# Altium PCB PI_V1.PcbDoc
Units mil, origin at the board's own origin, x right, y up, seen from the top; angles counter-clockwise.
Board outline 3075 x 3000 mil, 2 copper layers (Top Layer, Bottom Layer); 21 components, 18 nets, 101 pads, 134 vias.
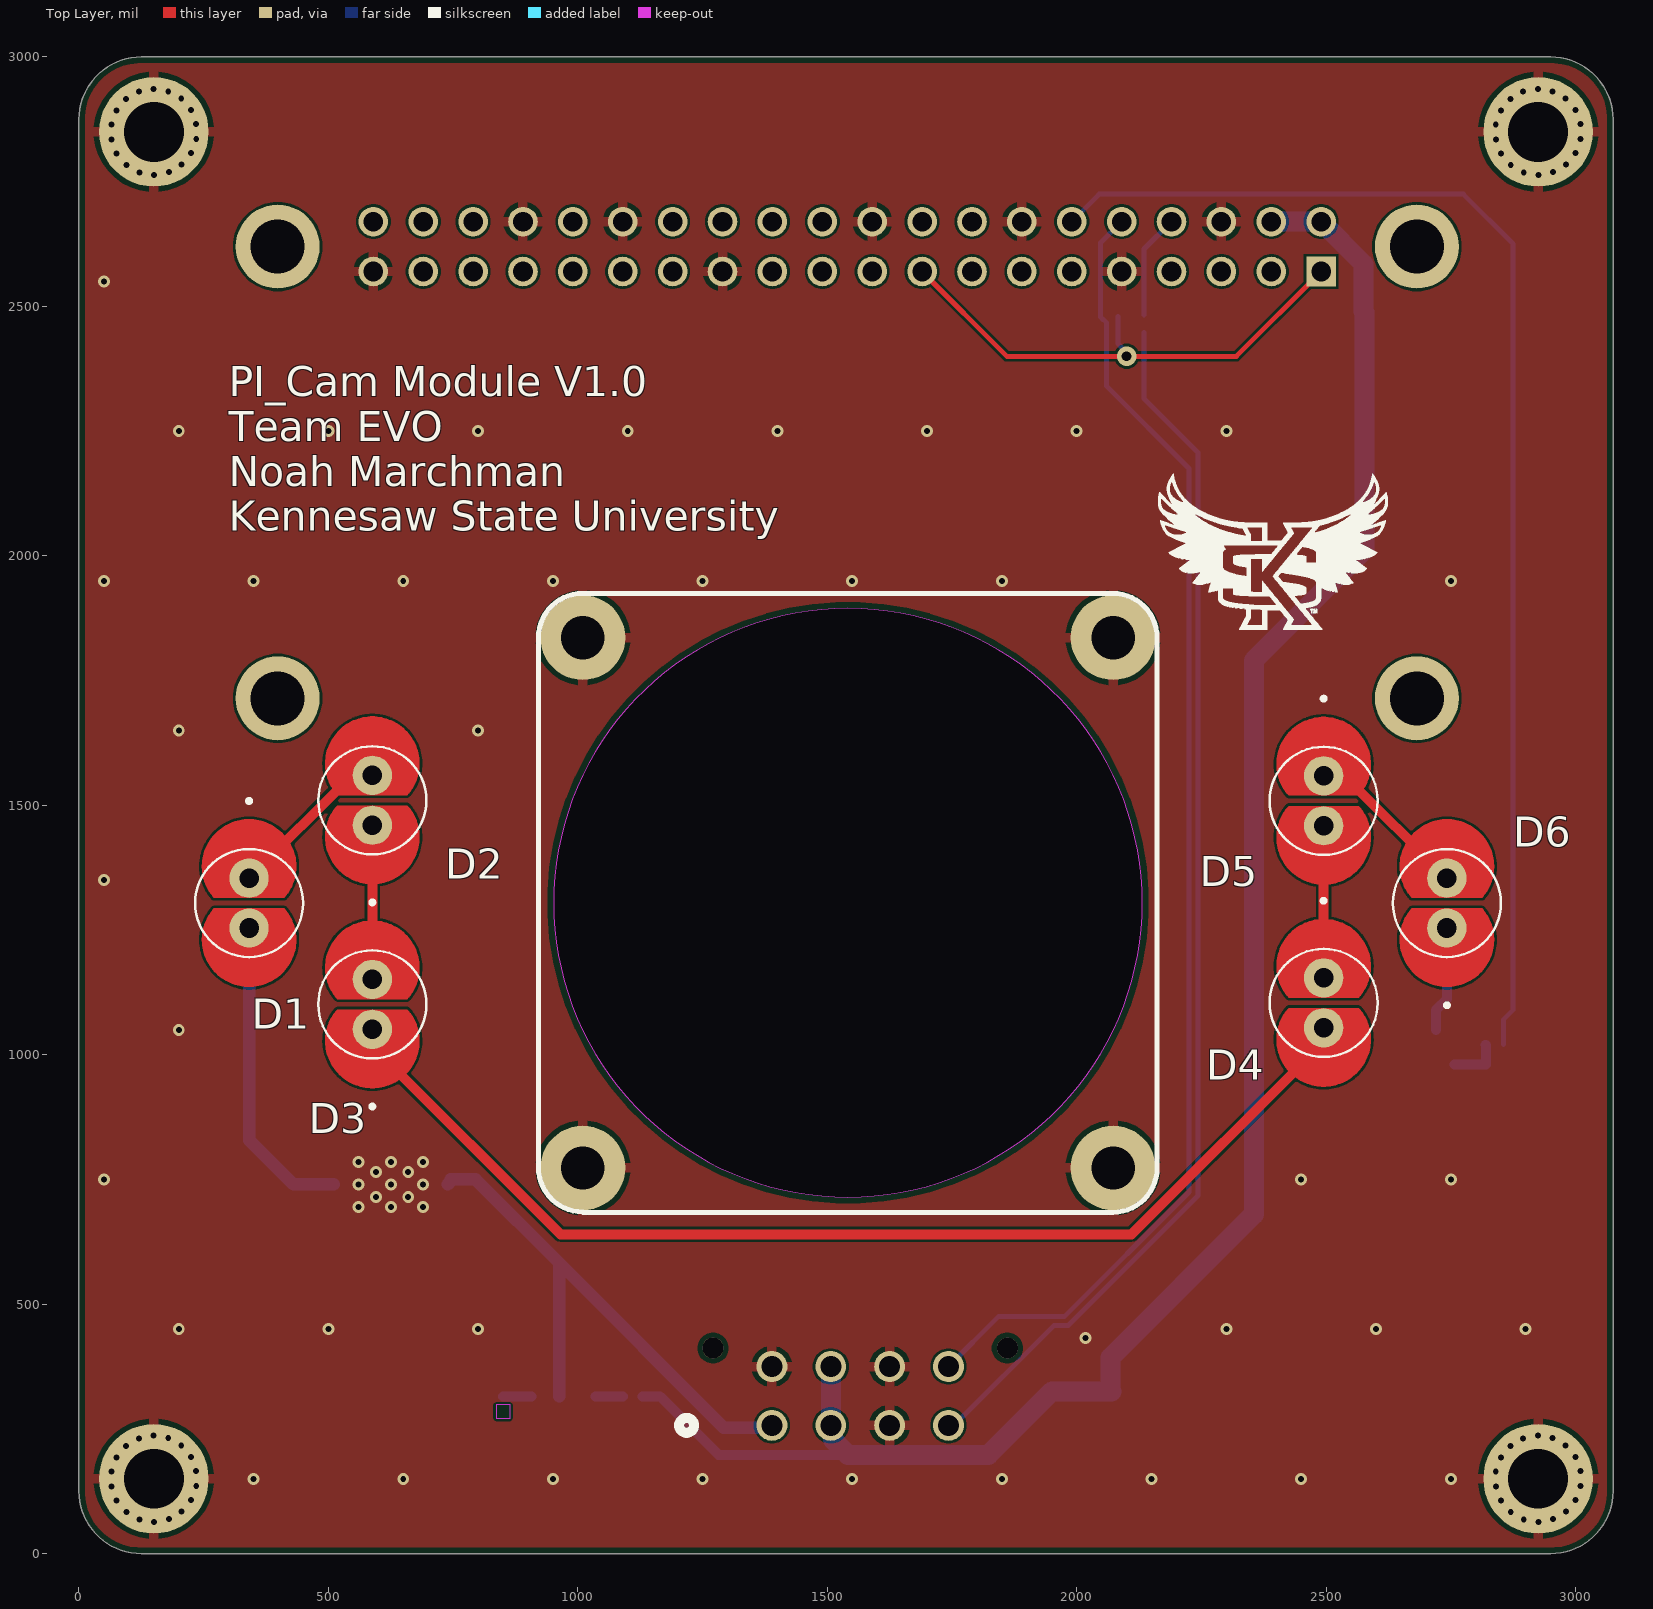
[diagram p0: Top Layer view]
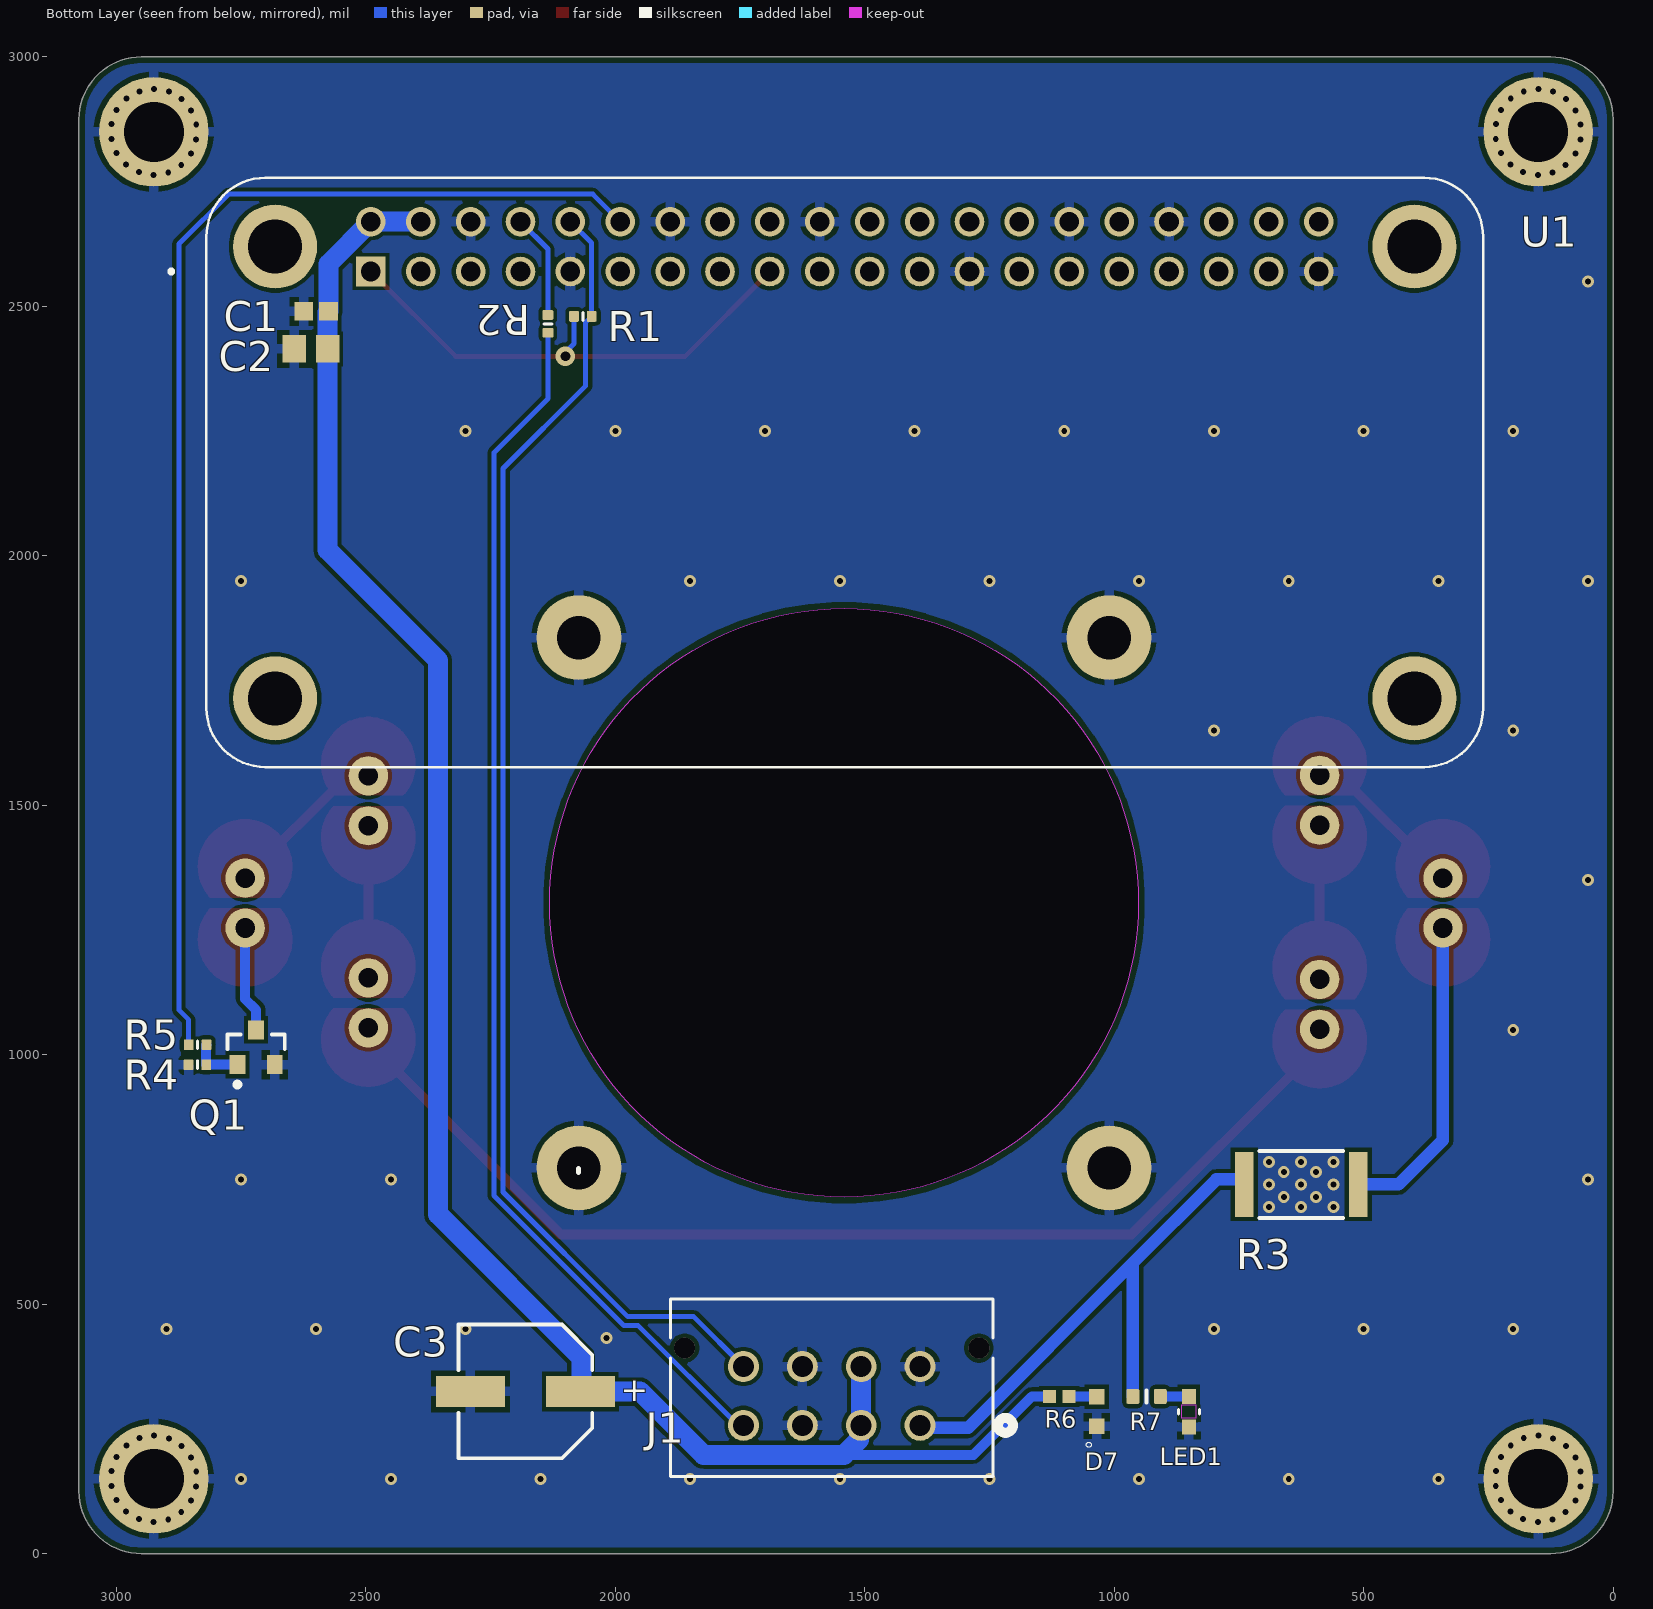
[diagram p1: Bottom Layer view, seen from below]
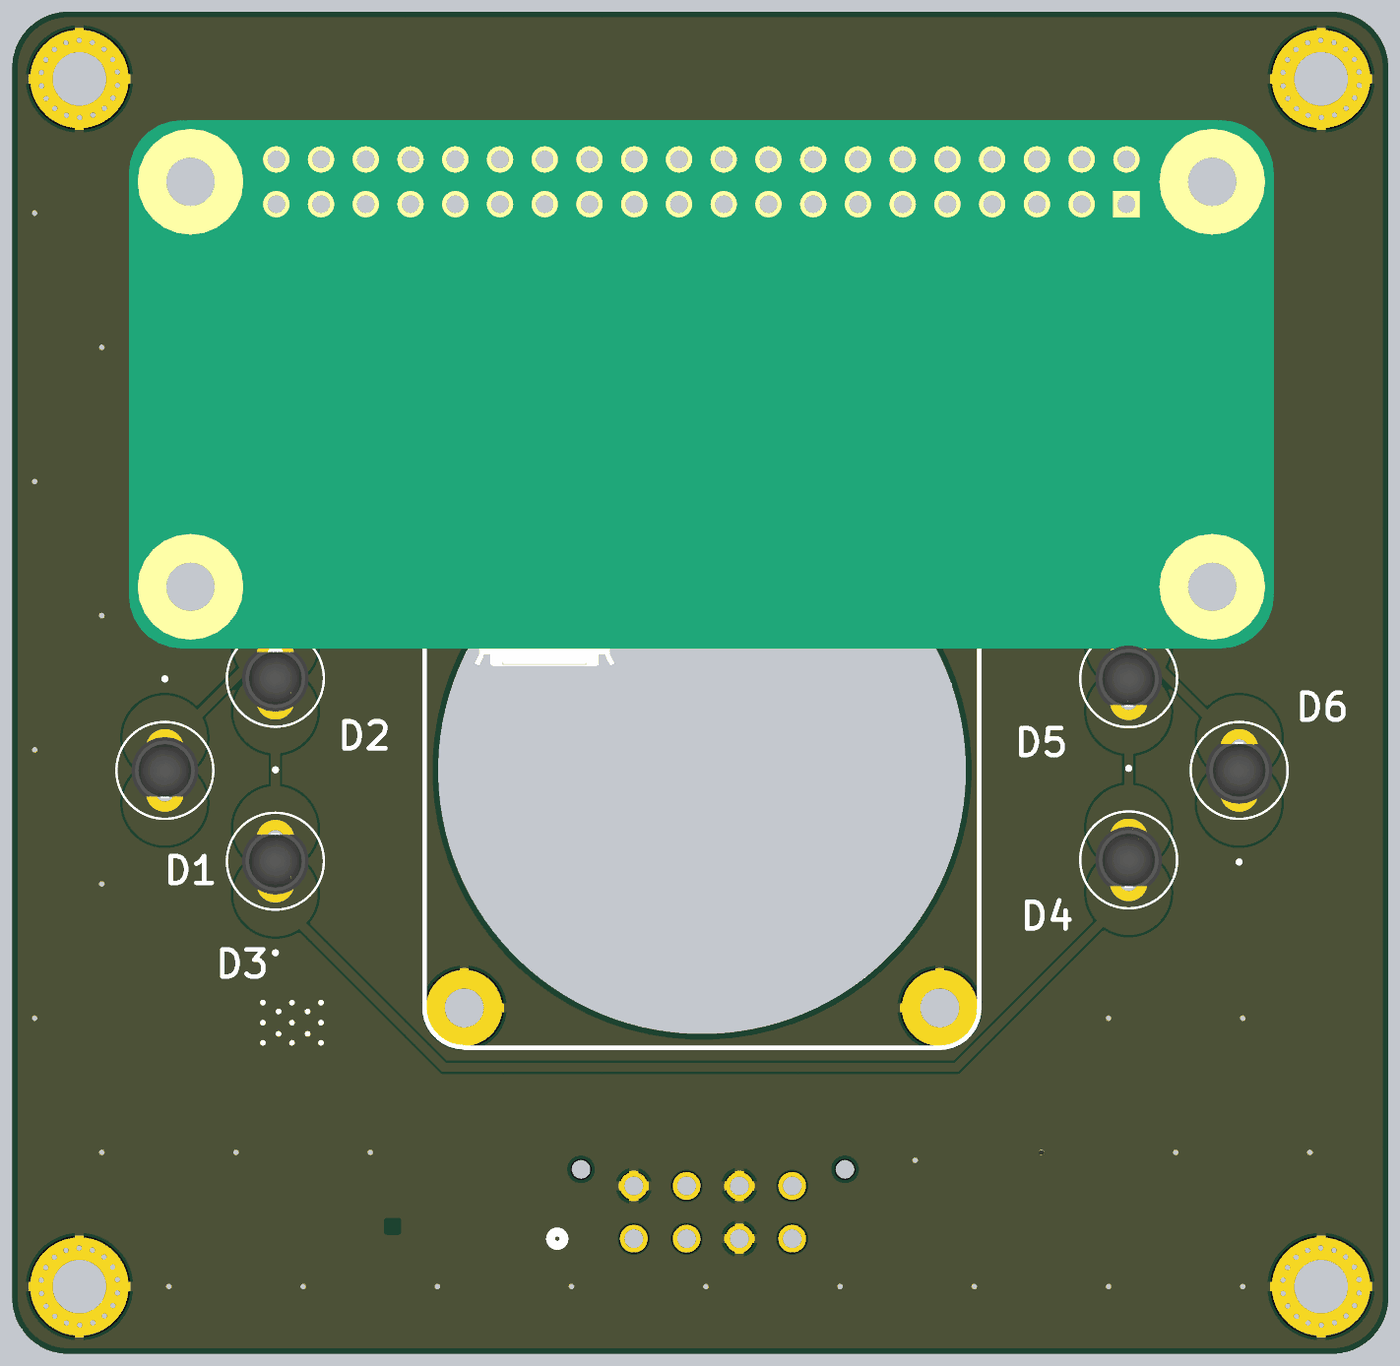
[diagram p2: 3D render of the assembled board from above, using the file's embedded part models]
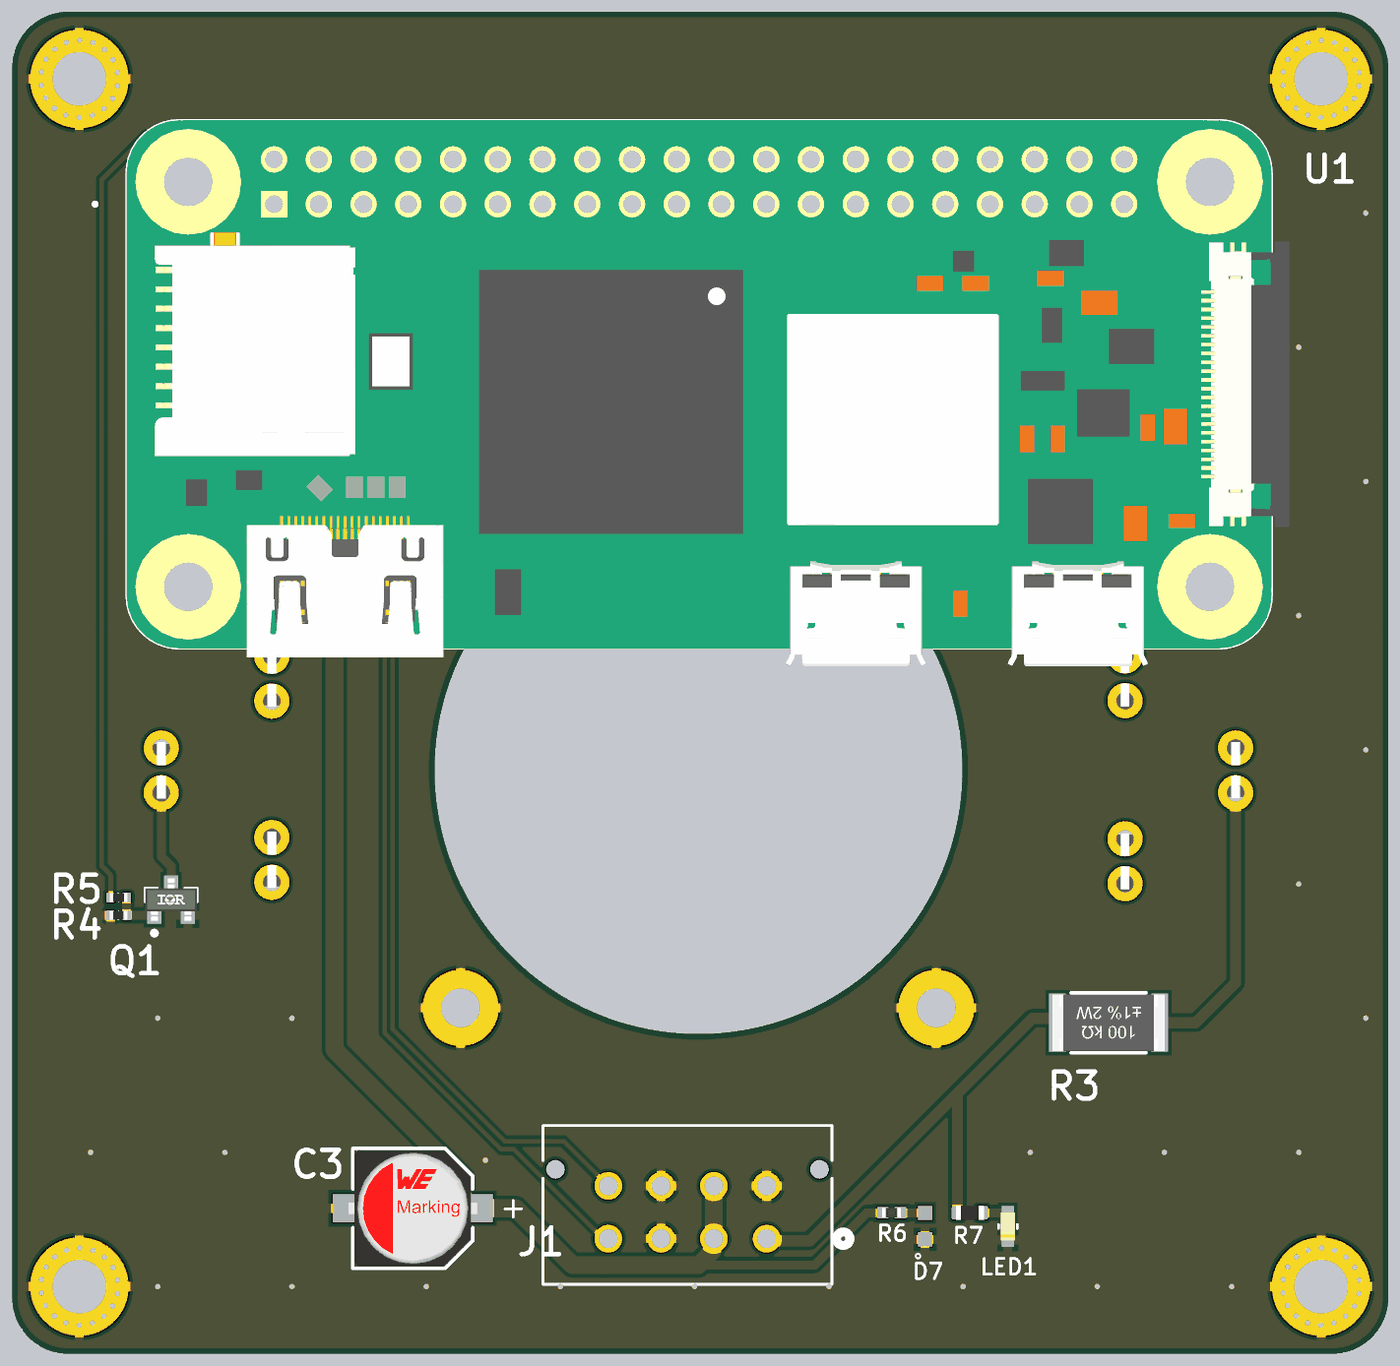
[diagram p3: 3D render of the assembled board from below, using the file's embedded part models]

## Layer stack, top to bottom
Top Solder: solder mask 0.4, Solder Resist, Dk 3.5
Top Layer: signal copper 1.4
Dielectric 1: dielectric 12.6, FR-4, Dk 4.8
Bottom Layer: signal copper 1.4
Bottom Solder: solder mask 0.4, Solder Resist, Dk 3.5

## Board outline
0,125 0,2875 cw(c125,2875) 125,3000 2950,3000 cw(c2950,2875) 3075,2875 3075,125 cw(c2950,125) 2950,0 125,0 cw(c125,125)
cut-out: 951.5,1304.5 ccw(c1541.5,1304.5) 1541.5,714.5 ccw(c1541.5,1304.5) 2131.5,1304.5 ccw(c1541.5,1304.5) 1541.5,1894.5 ccw(c1541.5,1304.5)

## Design rules (kind name [scope] priority, off if disabled: settings)
BoardOutlineClearance [All] p1: gap=12 ignorepadtopadclearanceinfootprint=FALSE
Clearance "Clearance Bottom Layer" [OnLayer('Bottom Layer')] p1: gap=8 ignorepadtopadclearanceinfootprint=TRUE except(10: Arc-Text Track-Text SMDPad-Text THPad-Text Via-Text Fill-Text Poly-Text Region-Text Text-Text)
Clearance [All] p2: gap=5 ignorepadtopadclearanceinfootprint=FALSE except(9.84: Arc-Hole Track-Hole SMDPad-Hole THPad-Hole Via-Hole Fill-Hole Poly-Hole Region-Hole Text-Hole)
Clearance "Clearance Top Layer" [OnLayer('Top Layer')] p3: gap=8 ignorepadtopadclearanceinfootprint=TRUE except(10: Arc-Text Track-Text SMDPad-Text THPad-Text Via-Text Fill-Text Poly-Text Region-Text Text-Text)
ComponentClearance [All] p1: gap=5 collisioncheckmode=3 verticalgap=5 showdistances=TRUE
DiffPairsRouting [All] p1: maxlimit=10 minlimit=5 mostfreqgap=5 toplayer_minwidth=5 toplayer_maxwidth=1000 toplayer_prefwidth=5 bottomlayer_minwidth=5 bottomlayer_maxwidth=1000 bottomlayer_prefwidth=5 maxuncoupledlength=500
Height [All] p1: minheight=0 maxheight=71497.94 prefheight=500
HoleSize [All] p1: absolutevalues=TRUE maxlimit=248.03 minlimit=11.81 maxpercent=80.000 minpercent=20.000
HoleToHoleClearance [All] p1: gap=9.84 allowstackedmicrovias=FALSE
MinimumAnnularRing [All] p1: minimumring=3
MinimumSolderMaskSliver [All] p1: minsoldermaskwidth=0
PlaneClearance [All] p1: clearance=8
PlaneConnect PlaneConnectPowerPads [InPadClass('PowerPads')] p1: planeconnectstyle=Direct reliefexpansion=20 reliefentries=4 reliefconductorwidth=10 reliefairgap=10
PlaneConnect [All] p2: pad.planeconnectstyle=Relief pad.reliefexpansion=11.81 pad.reliefentries=4 pad.reliefconductorwidth=5 pad.reliefairgap=5 via.planeconnectstyle=Direct via.reliefexpansion=11.81 via.reliefentries=4 via.reliefconductorwidth=5 via.reliefairgap=5
PolygonConnect PolygonConnect_1 [All] p1: thpad.connectstyle=Relief thpad.reliefconductorwidth=20 thpad.reliefentries=4 thpad.polygonreliefangle="90 Angle" thpad.airgapwidth=10 smdpad.connectstyle=Relief smdpad.reliefconductorwidth=20 smdpad.reliefentries=4 smdpad.polygonreliefangle="90 Angle" smdpad.airgapwidth=10 via.connectstyle=Direct via.reliefconductorwidth=20 via.reliefentries=4 via.polygonreliefangle="90 Angle" via.airgapwidth=10
PolygonConnect PolygonConnectPowerPads [All vs (InPadClass('PowerPads'))] p2: connectstyle=Direct reliefconductorwidth=10 reliefentries=4 polygonreliefangle="90 Angle" airgapwidth=10
PolygonConnect [All] p3: thpad.connectstyle=Relief thpad.reliefconductorwidth=5 thpad.reliefentries=4 thpad.polygonreliefangle="90 Angle" thpad.airgapwidth=5 smdpad.connectstyle=Relief smdpad.reliefconductorwidth=5 smdpad.reliefentries=4 smdpad.polygonreliefangle="90 Angle" smdpad.airgapwidth=5 via.connectstyle=Direct via.reliefconductorwidth=5 via.reliefentries=4 via.polygonreliefangle="90 Angle" via.airgapwidth=5
RoutingVias [All] p1: holewidth=11.81 width=23.62 viastyle="Through Hole" minholewidth=11.81 minwidth=23.62 maxholewidth=23.62 maxwidth=259.84
SilkToSilkClearance [All] p1: silktosilkclearance=0
SilkToSolderMaskClearance [IsPad] p1: minsilkscreentomaskgap=5 clearancetoexposedcopper=TRUE
SolderMaskExpansion [All] p1: expansion=2.95 istentingtop=FALSE
SupplyNets "Schematic Supply Nets_3" [InNet('+3V3')] p1: voltage=0.000
SupplyNets "Schematic Supply Nets_2" [InNet('+5')] p2: voltage=0.000
SupplyNets "Schematic Supply Nets_1" [InNet('GND')] p3: voltage=0.000
SupplyNets "Schematic Supply Nets" [InNet('+24')] p4: voltage=0.000
Width [All] p1: maxlimit=1000 minlimit=5 preferedwidth=5 minimp=50.000000 maximp=50.000000 favimp=50.000000
20 further rules are at their usual default settings.

## Components (designator, comment, footprint, x,y, rotation, side; value= is the part's Value field where it differs from the comment)
C1 "Capacitor 100 nF +/-10% 50 V 0603" CAPC1608X90X40NL10T20 2599.61,2490 r0 bottom value=100nF
C2 "Capacitor 10 uF +/- 10% 16 V 0805" CAPC2013X135X45NL10T25 2610,2415 r0 bottom value=10µF
C3 "100µF/50V" WCAP-ASLI_D6.3H7.7 2180,325 r180 bottom
D1 "SFH_4554" DIO_SFH_4554 341,1304 r270 top
D2 "SFH_4554" DIO_SFH_4554 588,1510 r90 top
D3 "SFH_4554" DIO_SFH_4554 588,1101 r90 top
D4 "SFH_4554" DIO_SFH_4554 2495,1104 r270 top
D5 "SFH_4554" DIO_SFH_4554 2495,1509 r270 top
D6 "SFH_4554" DIO_SFH_4554 2742,1304 r90 top
D7 "LTST-C190GKT" LEDM1608X80 1035,285 r90 bottom
J1 "430450813" CONN_SD-43045-005_08_MOL 1389,257 r180 bottom
LED1 "LTST-C191KRKT" LED_LTST-C191KRKT_LTO 850,284.5 r90 bottom
Q1 "IRLML0060" SOT95P237X112-3N-2-V 2720,1015 r90 bottom
R1 "10KR2F" RESC0402(1005)_L 2065,2480 r0 bottom value=10k
R2 "100R2F" RESC0402(1005)_L 2135,2465 r270 bottom value="100 Ohm"
R3 "CRGP2512F180R" FP-CRGP2512-IPC_C 625,740 r0 bottom value=180Ω
R4 "10KR2F" RESC0402(1005)_L 2837.72,980 r0 bottom value=10k
R5 "100R2F" RESC0402(1005)_L 2837.28,1020 r0 bottom value="100 Ohm"
R6 "Resistor 1k +/-1% 0402 100 mW" RESC1005X40X25ML05T05 1110,315 r180 bottom value=1k
R7 "120R3J" RESC0603(1608)_L 935,315 r180 bottom value=ERJ-3EKF7321V
U1 "RASPBERRY_PI_ZERO_2_W" MODULE_RASPBERRY_PI_ZERO_2_W 1540,2167.24 r180 bottom

## Footprints (in the part's own frame and the unit in brackets; to place one, negate y for a bottom-side part, rotate by r counter-clockwise, add the part's x,y. Pads: shape width x height; smd on the part's side, far side on the other; paste and mask are expansions set on the pad)
CAPC1608X90X40NL10T20 [mm] "Chip Capacitor, 2-Leads, Body 1.70x0.90mm, IPC Medium Density"
  rect 0.95x0.95 smd: 1(-0.625,0) 2(0.625,0)
  body extent -0.85,-0.45 0.85,0.45, height 0.9
CAPC2013X135X45NL10T25 [mm] "Chip Capacitor, 2-Leads, Body 2.10x1.35mm, IPC Medium Density"
  rect 1.2x1.4 smd: 1(-0.85,0) 2(0.85,0)
  body extent -1.05,-0.67 1.05,0.67, height 1.35
CONN_SD-43045-005_08_MOL [mil]
  round 62 hole 42: 1(0,0) 2(-118,0) 3(-236,0) 4(-354,0) 5(0,118) 6(-118,118) 7(-236,118) 8(-354,118)
  round 42 hole 42 unplated: ""(-472,155) ""(118,155)
  silkscreen extent -500,-102 186,253
DIO_SFH_4554 [mm]
  round 2 hole 1: A(1.27,0) C(-1.27,0)
  Top Layer region: 2.028,2.394 2.152,2.383 2.275,2.364 2.398,2.34 2.519,2.309 2.638,2.272 2.755,2.229 2.869,2.179 2.981,2.124 3.09,2.063 3.195,1.997 3.297,1.925 3.396,1.848 3.49,1.766 3.579,1.68 3.664,1.589 3.745,1.493 3.82,1.394 3.89,1.29 3.954,1.184 4.013,1.074 4.066,0.961 4.114,0.846 4.155,0.728 4.19,0.608 4.219,0.487 4.241,0.364 4.257,0.241 4.267,0.116 4.27,0 4.267,-0.116 4.257,-0.241 4.241,-0.364 4.219,-0.487 4.19,-0.608 4.155,-0.728 4.114,-0.846 4.066,-0.961 4.013,-1.074 3.954,-1.184 3.89,-1.29 3.82,-1.394 3.745,-1.493 3.664,-1.589 3.579,-1.68 3.49,-1.766 3.396,-1.848 3.297,-1.925 3.195,-1.997 3.09,-2.063 2.981,-2.124 2.869,-2.179 2.755,-2.229 2.638,-2.272 2.519,-2.309 2.398,-2.34 2.275,-2.364 2.152,-2.383 2.028,-2.394 1.895,-2.4 1.827,-2.4 1.768,-2.399 1.71,-2.396 1.652,-2.392 1.593,-2.387 1.535,-2.38 1.478,-2.371 1.42,-2.361 1.363,-2.35 1.306,-2.337 1.249,-2.323 1.193,-2.307 1.137,-2.29 1.081,-2.272 1.026,-2.252 0.972,-2.231 0.918,-2.209 0.864,-2.185 0.812,-2.16 0.76,-2.133 0.708,-2.105 0.657,-2.076 0.608,-2.046 0.558,-2.014 0.51,-1.982 0.462,-1.948 0.416,-1.912 0.37,-1.876 0.325,-1.839 0.27,-1.79 0.27,0.06 0.27,1.79 0.325,1.839 0.37,1.876 0.416,1.912 0.462,1.948 0.51,1.982 0.558,2.014 0.608,2.046 0.657,2.076 0.708,2.105 0.76,2.133 0.812,2.16 0.864,2.185 0.918,2.209 0.972,2.231 1.026,2.252 1.081,2.272 1.137,2.29 1.193,2.307 1.249,2.323 1.306,2.337 1.363,2.35 1.42,2.361 1.478,2.371 1.535,2.38 1.593,2.387 1.652,2.392 1.71,2.396 1.768,2.399 1.827,2.4 1.895,2.4
  Top Layer region: -1.768,2.399 -1.71,2.396 -1.652,2.392 -1.593,2.387 -1.535,2.38 -1.478,2.371 -1.42,2.361 -1.363,2.35 -1.306,2.337 -1.249,2.323 -1.193,2.307 -1.137,2.29 -1.081,2.272 -1.026,2.252 -0.972,2.231 -0.918,2.209 -0.864,2.185 -0.812,2.16 -0.76,2.133 -0.708,2.105 -0.657,2.076 -0.608,2.046 -0.558,2.014 -0.51,1.982 -0.462,1.948 -0.416,1.912 -0.37,1.876 -0.325,1.839 -0.27,1.79 -0.27,0.06 -0.27,-1.79 -0.325,-1.839 -0.37,-1.876 -0.416,-1.912 -0.462,-1.948 -0.51,-1.982 -0.558,-2.014 -0.608,-2.046 -0.657,-2.076 -0.708,-2.105 -0.76,-2.133 -0.812,-2.16 -0.864,-2.185 -0.918,-2.209 -0.972,-2.231 -1.026,-2.252 -1.081,-2.272 -1.137,-2.29 -1.193,-2.307 -1.249,-2.323 -1.306,-2.337 -1.363,-2.35 -1.42,-2.361 -1.478,-2.371 -1.535,-2.38 -1.593,-2.387 -1.652,-2.392 -1.71,-2.396 -1.768,-2.399 -1.827,-2.4 -1.895,-2.4 -2.028,-2.394 -2.152,-2.383 -2.275,-2.364 -2.398,-2.34 -2.519,-2.309 -2.638,-2.272 -2.755,-2.229 -2.869,-2.179 -2.981,-2.124 -3.09,-2.063 -3.195,-1.997 -3.297,-1.925 -3.396,-1.848 -3.49,-1.766 -3.579,-1.68 -3.664,-1.589 -3.745,-1.493 -3.82,-1.394 -3.89,-1.29 -3.954,-1.184 -4.013,-1.074 -4.066,-0.961 -4.114,-0.846 -4.155,-0.728 -4.19,-0.608 -4.219,-0.487 -4.241,-0.364 -4.257,-0.241 -4.267,-0.116 -4.27,0 -4.267,0.116 -4.257,0.241 -4.241,0.364 -4.219,0.487 -4.19,0.608 -4.155,0.728 -4.114,0.846 -4.066,0.961 -4.013,1.074 -3.954,1.184 -3.89,1.29 -3.82,1.394 -3.745,1.493 -3.664,1.589 -3.579,1.68 -3.49,1.766 -3.396,1.848 -3.297,1.925 -3.195,1.997 -3.09,2.063 -2.981,2.124 -2.869,2.179 -2.755,2.229 -2.638,2.272 -2.519,2.309 -2.398,2.34 -2.275,2.364 -2.152,2.383 -2.028,2.394 -1.895,2.4 -1.827,2.4
  silkscreen extent -5.3,-2.75 2.75,2.75, body extent -1.9,-1.9 1.6,1.9, height 5.2
FP-CRGP2512-IPC_C [mil]
  rect 37.72x130.17 smd paste+0 mask+0: 1(-114.25,0) 2(114.25,0)
  silkscreen extent -84,-67 84,67, body extent -125,-63 125,63, height 26
LED_LTST-C191KRKT_LTO [mil]
  rect 30x28 smd paste+0 mask+0: 1(-30.5,0) 2(30.5,0)
  Top Layer keep-out region: -13.5,-14 -13.5,14 13.5,14 13.5,-14
  Keep-Out Layer region: -13.5,-14 -13.5,14 13.5,14 13.5,-14
  silkscreen extent -4,-21 4,21, body extent -31,-16 31,16, height 22
LEDM1608X80 [mm]
  rect 0.8x0.8 smd: A(0.75,0) C(-0.75,0)
  silkscreen extent -1.83,0.27 -1.57,0.53
MODULE_RASPBERRY_PI_ZERO_2_W [mm]
  rect 1.508x1.508 / inner round 1.508 / far side rect 1.508x1.508 hole 1: 1(-24.13,10.23)
  round 1.508 hole 1: 2(-24.13,12.77) 3(-21.59,10.23) 4(-21.59,12.77) 5(-19.05,10.23) 6(-19.05,12.77) 7(-16.51,10.23) 8(-16.51,12.77) 9(-13.97,10.23) 10(-13.97,12.77) 11(-11.43,10.23) 12(-11.43,12.77) 13(-8.89,10.23) 14(-8.89,12.77) 15(-6.35,10.23) 16(-6.35,12.77) 17(-3.81,10.23) 18(-3.81,12.77) 19(-1.27,10.23) 20(-1.27,12.77) 21(1.27,10.23) 22(1.27,12.77) 23(3.81,10.23) 24(3.81,12.77) 25(6.35,10.23) 26(6.35,12.77) 27(8.89,10.23) 28(8.89,12.77) 29(11.43,10.23) 30(11.43,12.77) 31(13.97,10.23) 32(13.97,12.77) 33(16.51,10.23) 34(16.51,12.77) 35(19.05,10.23) 36(19.05,12.77) 37(21.59,10.23) 38(21.59,12.77) 39(24.13,10.23) 40(24.13,12.77)
  round 4.274 hole 2.75 unplated: ""(-29,-11.5) ""(-29,11.5) ""(29,-11.5) ""(29,11.5)
  silkscreen extent -34.39,-15 32.5,15, body extent -32.5,-16 33.5,15, height 4.57
RESC0402(1005)_L [mm] "Chip Resistor, Body 1.0x0.5mm, IPC High Density"
  rrect25% 0.5x0.55 smd: 1(-0.45,0) 2(0.45,0)
  silkscreen extent 0,-0.2 0,0.2, body extent -0.5,-0.25 0.5,0.25, height 0.3
RESC0603(1608)_L [mm] "Chip Resistor, Body 1.6x0.8mm, IPC High Density"
  rrect25% 0.66x0.76 smd: 1(-0.7,0) 2(0.7,0)
  silkscreen extent 0,-0.3 0,0.3, body extent -0.8,-0.4 0.8,0.4, height 0.45
RESC1005X40X25ML05T05 [mm] "Chip Resistor, 2-Leads, Body 1.05x0.55mm, IPC Low Density"
  rect 0.65x0.65 smd: 1(-0.5,0) 2(0.5,0)
  body extent -0.53,-0.28 0.53,0.28, height 0.4
SOT95P237X112-3N-2-V [mm] "SOT,0.95mm pitch;3 pin,1.30mm W X 2.92mm L X 1.12mm H body"
  rect 0.972x0.802 smd paste+0 mask+0: 1(-0.885,0.95) 2(-0.885,-0.95) 3(0.885,0)
  silkscreen extent -2.02,-1.46 0.65,1.46, body extent -1.2,-1.46 1.2,1.46, height 1.12
WCAP-ASLI_D6.3H7.7 [mm] "Aluminium Electrolytic V-Chip SMT Capacitors, 6.3x7.7mm"
  rect 3.5x1.6 smd: 1(2.8,0) 2(-2.8,0)
  silkscreen extent -3.4,-3.4 3.4,3.4, body extent -3.65,-3.3 3.65,3.3, height 7.7

## Part data
C1: library part CMP-001-00017-6, "Chip Capacitor, 100 nF, +/- 10%, 50 V, 0603 (1608 Metric)", Capacitor Type=Ceramic, Case/Package=0603, Max Operating Temperature=125°C, Min Operating Temperature=-55°C, Tolerance=10%, Voltage Rating=50V, Mounting Technology=SM, Pins=2, RoHS Compliant=True
C2: library part CMP-001-00015-6, "Chip Capacitor, 10 uF, +/- 10%, 16 V, 0805 (2012 Metric)", Capacitor Type=Ceramic, Case/Package=0805, Max Operating Temperature=85°C, Min Operating Temperature=-55°C, Tolerance=10%, Voltage Rating=16V, Mounting Technology=SM, Pins=2, RoHS Compliant=True
C3: library part CMP-03913-54202496-2, "Cap Aluminum Lytic 100uF 35V 20% (6.3 X 7.7mm) SMD 300mA 2000h 105C T/R", Capacitance=100µF, Case/Package=Radial, ESR (Equivalent Series Resistance)=321.392mΩ, Insulation Resistance=1MΩ, Leakage Current=35µA, Max Operating Temperature=105°C, Min Operating Temperature=-55°C, Ripple Current=300mA, Tolerance=20%, Voltage Rating=35V, Diameter=6.3mm, Dissipation Factor=14%, Height=7.7mm, Impedance=380mΩ, Length=7.7mm, Life (Hours)=2000hours, Packaging="Cut Tape", REACH SVHC=Unknown, Ripple Current (AC)=300mA, RoHS=Compliant, Voltage Rating (DC)=35V, Width=6.6mm
D1 D2 D3 D4 D5 D6: "Infrared (IR) Emitter 850nm 1.7V 100mA 550mW/sr @ 100mA 20Â° Radial", Package="Radial OSRAM Opto", Check_prices=https://www.snapeda.com/parts/SFH%204554/OSRAM/view-part/?ref=eda, MF="OSRAM Opto", MP="SFH 4554", SnapEDA_Link=https://www.snapeda.com/parts/SFH%204554/OSRAM/view-part/?ref=snap
D7 J1: Package=None, Availability=Unavailable, Price=None
  D7: MF="{'manufacturer': u'Lite-On Inc.'}", MP=LTST-C190GKT
  J1: MP=430450813
LED1: "Description", Manufacturer_Name=LITE-ON, Copyright="Copyright (C) 2025 Ultra Librarian. All rights reserved.", Manufacturer_Part_Number=LTST-C191KRKT
Q1: "Insulated-Gate Field-Effect Transistor (IGFET), N-Channel, Enhancement, Body Diode, Pin 1 Gate, 2 Source, 3 Drain, 3 Pins", Manufacturer="Infineon Technologies", Manufacturer Order Number=IRLML0060, PackageReference=PG-SOT23-3-901
R1 R4: library part CMP-009-00066-2, "10K 0.063W 1% 0402 (1005 Metric)  SMD", Case/Package=0402, Power=63mW, Tolerance=1%, Mounting Technology=SMT, Pins=2
R2 R5: library part CMP-009-00065-2, "100R 0.063W 1% 0402 (1005 Metric)  SMD", Case/Package=0402, Power=63mW, Tolerance=1%, Mounting Technology=SMT, Pins=2
R3: library part CMP-03211-003209-1, "Res, 180R, 1%, 2W, 2512, Thick Film", Ambient Temperature Range High=+70°C, Manufacturer=TE, Package=CRGP2512, Power Rating=2W, Resistance=180Ω, Temperature="-55°C to +155°C", Temperature Coefficient=±100ppm/°C, Temperature Range High=+155°C, Temperature Range Low=-55°C, Tolerance=0.01, Voltage Rating=500V, Automotive=No, Category=Res, ComponentLink2Description=Datasheet, ComponentLink2URL=https://www.mouser.ca/datasheet/2/418/NG_DS_9-1773463-9_A-1358566.pdf, Composition="Thick Film", Device Class L1="Passive Components", Device Class L2=Resistors, Device Class L3="Chip SMD Resistors", Digikey Description="Res, 180R, 1%, 2W, 2512, Thick Film", Height=0.65mm, Ipc Land Pattern Name=RESC635320X55, Lead Free=Yes, Manufacturer Part Number=CRGP2512F180R, Mouser Description="Res, 180R, 1%, 2W, 2512, Thick Film", Octopart=https://octopart.com/crgp2512f180r-te+connectivity-91019037, RoHS=TRUE, Series=CRGP
R6: library part CMP-009-00009-5, "Chip Resistor, 1 KOhm, +/- 1%, 0.1 W, -55 to 155 degC, 0402 (1005 Metric)", Case/Package=0402, Max Operating Temperature=155°C, Min Operating Temperature=-55°C, Power=100mW, Tolerance=1%, Voltage Rating=50V, Mounting Technology=SM, Pins=2, RoHS Compliant=True
R7: library part CMP-009-00069-2, "120R 0.1W 5% 0603 (1608 Metric)  SMD", Case/Package=0603, Power=100mW, Tolerance=5%, Mounting Technology=SMT, Pins=2
U1: "At the heart of Raspberry Pi Zero 2 W is RP3A0, a custom-built system-in-package designed by Raspberry Pi in the UK.", Package=None, Check_prices=https://www.snapeda.com/parts/RASPBERRY%20PI%20ZERO%202%20W/Raspberry+Pi/view-part/?ref=eda, MF="Raspberry Pi", MP="RASPBERRY PI ZERO 2 W", SnapEDA_Link=https://www.snapeda.com/parts/RASPBERRY%20PI%20ZERO%202%20W/Raspberry+Pi/view-part/?ref=snap

## Free pads (board coordinates)
  round 170 hole 87 mask+4.02: 16(1010,1836) 17(2073,1836) 18(1010,773) 19(2073,773)
  round 220 hole 120 mask+4.02: 20(150,2850) 21(2925,2850) 22(2925,150) 23(150,150)

## Via types
v1: diameter 24, hole 12, Top Layer to Bottom Layer, tented both sides, 120 vias
v2: diameter 24, hole 12, Top Layer to Bottom Layer, 13 vias
v3: diameter 39.37, hole 19.68, Top Layer to Bottom Layer, 1 vias

## Nets (pads, with @x,y where several pads share a name; then routed paths per layer and width w, separated by ;. In a path a pad name is that pad's centre, name@x,y a point inside that pad or via, vN(x,y) a via of type N, cw(c..) or ccw(c..) an arc to the next point about the centre after c; other vN are vias at no path point)
+3V3: R1.2 U1.1 U1.17 | length 1028
  Top Layer w10: U1.17 1860,2400 v3(2100,2400) 2320,2400 U1.1
  Bottom Layer w10: R1.2 2082.72,2425.23 2100,2407.95 v3(2100,2400)
+5: C1.1 C2.1 C3.1 J1.2 J1.6 R6.1 U1.2 U1.4 | length 3924.6
  Bottom Layer w20: R6.1 1165,315 1282,198 1541.43,198
  Bottom Layer w40: J1.6 J1.2 1511.21,252.79 1511.21,228.22 1541.43,198 1565,198 1823,198 1950,325 C3.1 2068.06,326.7 2068.06,393.06 2355,680 2355,1790 2576.54,2011.54 C2.1 2576.54,2488.46 C1.1 2575,2585 U1.2 U1.4
+24: J1.1 R3.2 R7.1 | length 1133.1
  Bottom Layer w25: R3.2 745.61,746.36 745.61,750 795,750 965,580 ; R7.1 962.56,577.56 965,580 ; J1.1@1393.82,252.18 1292.82,252.18 965,580
GND: C1.2 C2.2 C3.2 D7.C J1.3 J1.5 J1.7 LED1.1 pad.16 pad.17 pad.18 pad.19 pad.20 pad.21 pad.22 pad.23 Q1.2 R4.2 U1.6 U1.9 U1.14 U1.20 U1.25 U1.30 U1.34 U1.39 | length 0
  other v1: 150.6,63.75 2925.6,63.75 121.06,68.74 180.07,69.15 2896.06,68.74 2955.06,69.15 95.02,83.54 205.9,84.31 2870.02,83.54 2980.9,84.31 75.6,106.35 2850.6,106.35 225,107.39 3000,107.39 65.16,134.43 2840.16,134.43 235.05,135.61 3010.05,135.61 350,150 650,150 950,150 1250,150 1550,150 1850,150 2150,150 2450,150 2750,150 64.95,164.39 2839.95,164.39 234.84,165.57 3009.84,165.57 75,192.61 2850,192.61 224.4,193.65 2999.4,193.65 94.1,215.69 204.98,216.46 2869.1,215.69 2979.98,216.46 119.93,230.85 119.93,230.85 178.94,231.26 2894.93,230.85 2894.93,230.85 2953.94,231.26 149.4,236.25 149.4,236.25 2924.4,236.25 2924.4,236.25 2017.71,432.35 200,450 500,450 800,450 2300,450 2600,450 2900,450 50,750 2450,750 2750,750 200,1050 50,1350 200,1650 800,1650 50,1950 350,1950 650,1950 950,1950 1250,1950 1550,1950 1850,1950 2750,1950 200,2250 500,2250 800,2250 1100,2250 1400,2250 1700,2250 2000,2250 2300,2250 50,2550 150.6,2763.75 2925.6,2763.75 121.06,2768.74 180.07,2769.15 2896.06,2768.74 2955.06,2769.15 95.02,2783.54 205.9,2784.31 2870.02,2783.54 2980.9,2784.31 75.6,2806.35 2850.6,2806.35 225,2807.39 3000,2807.39 65.16,2834.43 2840.16,2834.43 235.05,2835.61 3010.05,2835.61 64.95,2864.39 2839.95,2864.39 234.84,2865.57 3009.84,2865.57 75,2892.61 2850,2892.61 224.4,2893.65 2999.4,2893.65 94.1,2915.69 204.98,2916.46 2869.1,2915.69 2979.98,2916.46 119.93,2930.85 119.93,2930.85 178.94,2931.26 2894.93,2930.85 2894.93,2930.85 2953.94,2931.26 149.4,2936.25 149.4,2936.25 2924.4,2936.25 2924.4,2936.25
  other v2: 560,695 625,695 690,695 595,715 660,715 560,740 625,740 690,740 595,765 660,765 560,785 625,785 690,785
NetD1_A: D1.A R3.1 | length 631.6
  Bottom Layer w25: D1.A 341,829 430,740 R3.1
NetD1_C: D1.C D2.A | length 332.3
  Top Layer w20: D1.C 547,1560 D2.A
NetD2_C: D2.C D3.A | length 309
  Top Layer w20: D3.A D2.C
NetD3_C: D3.C D4.A | length 2285.6
  Top Layer w20: D3.C 599.24,1039.76 599.24,1005.76 965,640 2110,640 2483.76,1013.76 2483.76,1042.76 D4.A
NetD4_C: D4.C D5.A | length 305
  Top Layer w20: D4.C D5.A
NetD5_C: D5.C D6.A | length 331.9
  Top Layer w20: D5.C 2537,1559 D6.A
NetD6_C: D6.C Q1.3 | length 213.3
  Bottom Layer w20: Q1.3 2720,1090 2742,1112 D6.C
NetD7_A: D7.A R6.2 | length 55.5
  Bottom Layer w20: D7.A 1035.24,314.76 1090.08,314.76 R6.2
NetJ1_4: J1.4 R2.2 | length 2465.2
  Bottom Layer w10: J1.4 1754.08,257 1954.08,457 1982.46,457 2243,717.54 2243,2207 2135,2315 R2.2
NetJ1_8: J1.8 R1.1 U1.10 | length 2663.9
  Bottom Layer w10: J1.8 1843,475 1975,475 2225,725 2225,2175 2059.87,2340.13 2059.87,2467.41 2053.11,2474.17 2052.13,2474.17 2047.28,2479.02 2047.28,2627.28 U1.10
NetLED1_2: LED1.2 R7.2 | length 57.4
  Bottom Layer w20: LED1.2 R7.2
NetQ1_1: Q1.1 R4.1 R5.1 | length 102.8
  Bottom Layer w20: Q1.1 2819.84,980.16 R4.1 2820,1019.57 R5.1
NetR2_1: R2.1 U1.8 | length 210.1
  Bottom Layer w10: R2.1 2135,2615 U1.8
NetR5_2: R5.2 U1.12 | length 2562.5
  Bottom Layer w10: U1.12 2045,2725 2775,2725 2875,2625 2875,1090 2855,1070 R5.2
pads on no net: J1. U1. U1.3 U1.5 U1.7 U1.11 U1.13 U1.15 U1.16 U1.18 U1.19 U1.21 U1.22 U1.23 U1.24 U1.26 U1.27 U1.28 U1.29 U1.31 U1.32 U1.33 U1.35 U1.36 U1.37 U1.38 U1.40

## Polygon pours and split planes (outlines as drawn)
GND on Bottom Layer "GND" (solid, remove dead copper, pour order 3): 0,125 0,2875 cw(c125,2875) 125,3000 2950,3000 cw(c2950,2875) 3075,2875 3075,125 cw(c2950,125) 2950,0 125,0 cw(c125,125)
GND on Top Layer "GND" (solid, remove dead copper, pour order 2): 0,125 0,2875 cw(c125,2875) 125,3000 2950,3000 cw(c2950,2875) 3075,2875 3075,125 cw(c2950,125) 2950,0 125,0 cw(c125,125)

## Silkscreen, mask and mechanical layers (free items; w line width, h text height)
Top Overlay:
  drawing of 13 lines, arcs and shapes, not listed
  text "PI_Cam Module V1.0 / Team EVO / Noah Marchman / Kennesaw State University" at 300,2050 h60
Bottom Overlay:
  lines w10: 2074,764 2074,772
Mechanical 1:
  circle w10: c1541.5,1304.5 r590
  lines w10: 0,125 ccw(c125,125) 125,0 2950,0 ccw(c2950,125) 3075,125 3075,2875 ccw(c2950,2875) 2950,3000 125,3000 ccw(c125,2875) 0,2875 0,125

## Dimensions
125,3000 to 125,0 on Mechanical 1
0,2875 to 3075,2875 on Mechanical 1

## Text inside footprints (layer, text, board x,y; h text height)
C3: Bottom Overlay "+" at 1989.06,305.32 h48